# Altium PCB Power_Board-V1.0.PcbDoc (part 3 of 4)
Units mm, origin at the board's own origin, x right, y up, seen from the top; angles counter-clockwise.
Board outline 64.6 x 83.5 mm, 4 copper layers (Top Layer, GND1, GND2, Bottom Layer), stack 0.603 mm thick; 188 components, 131 nets, 487 pads, 123 vias.
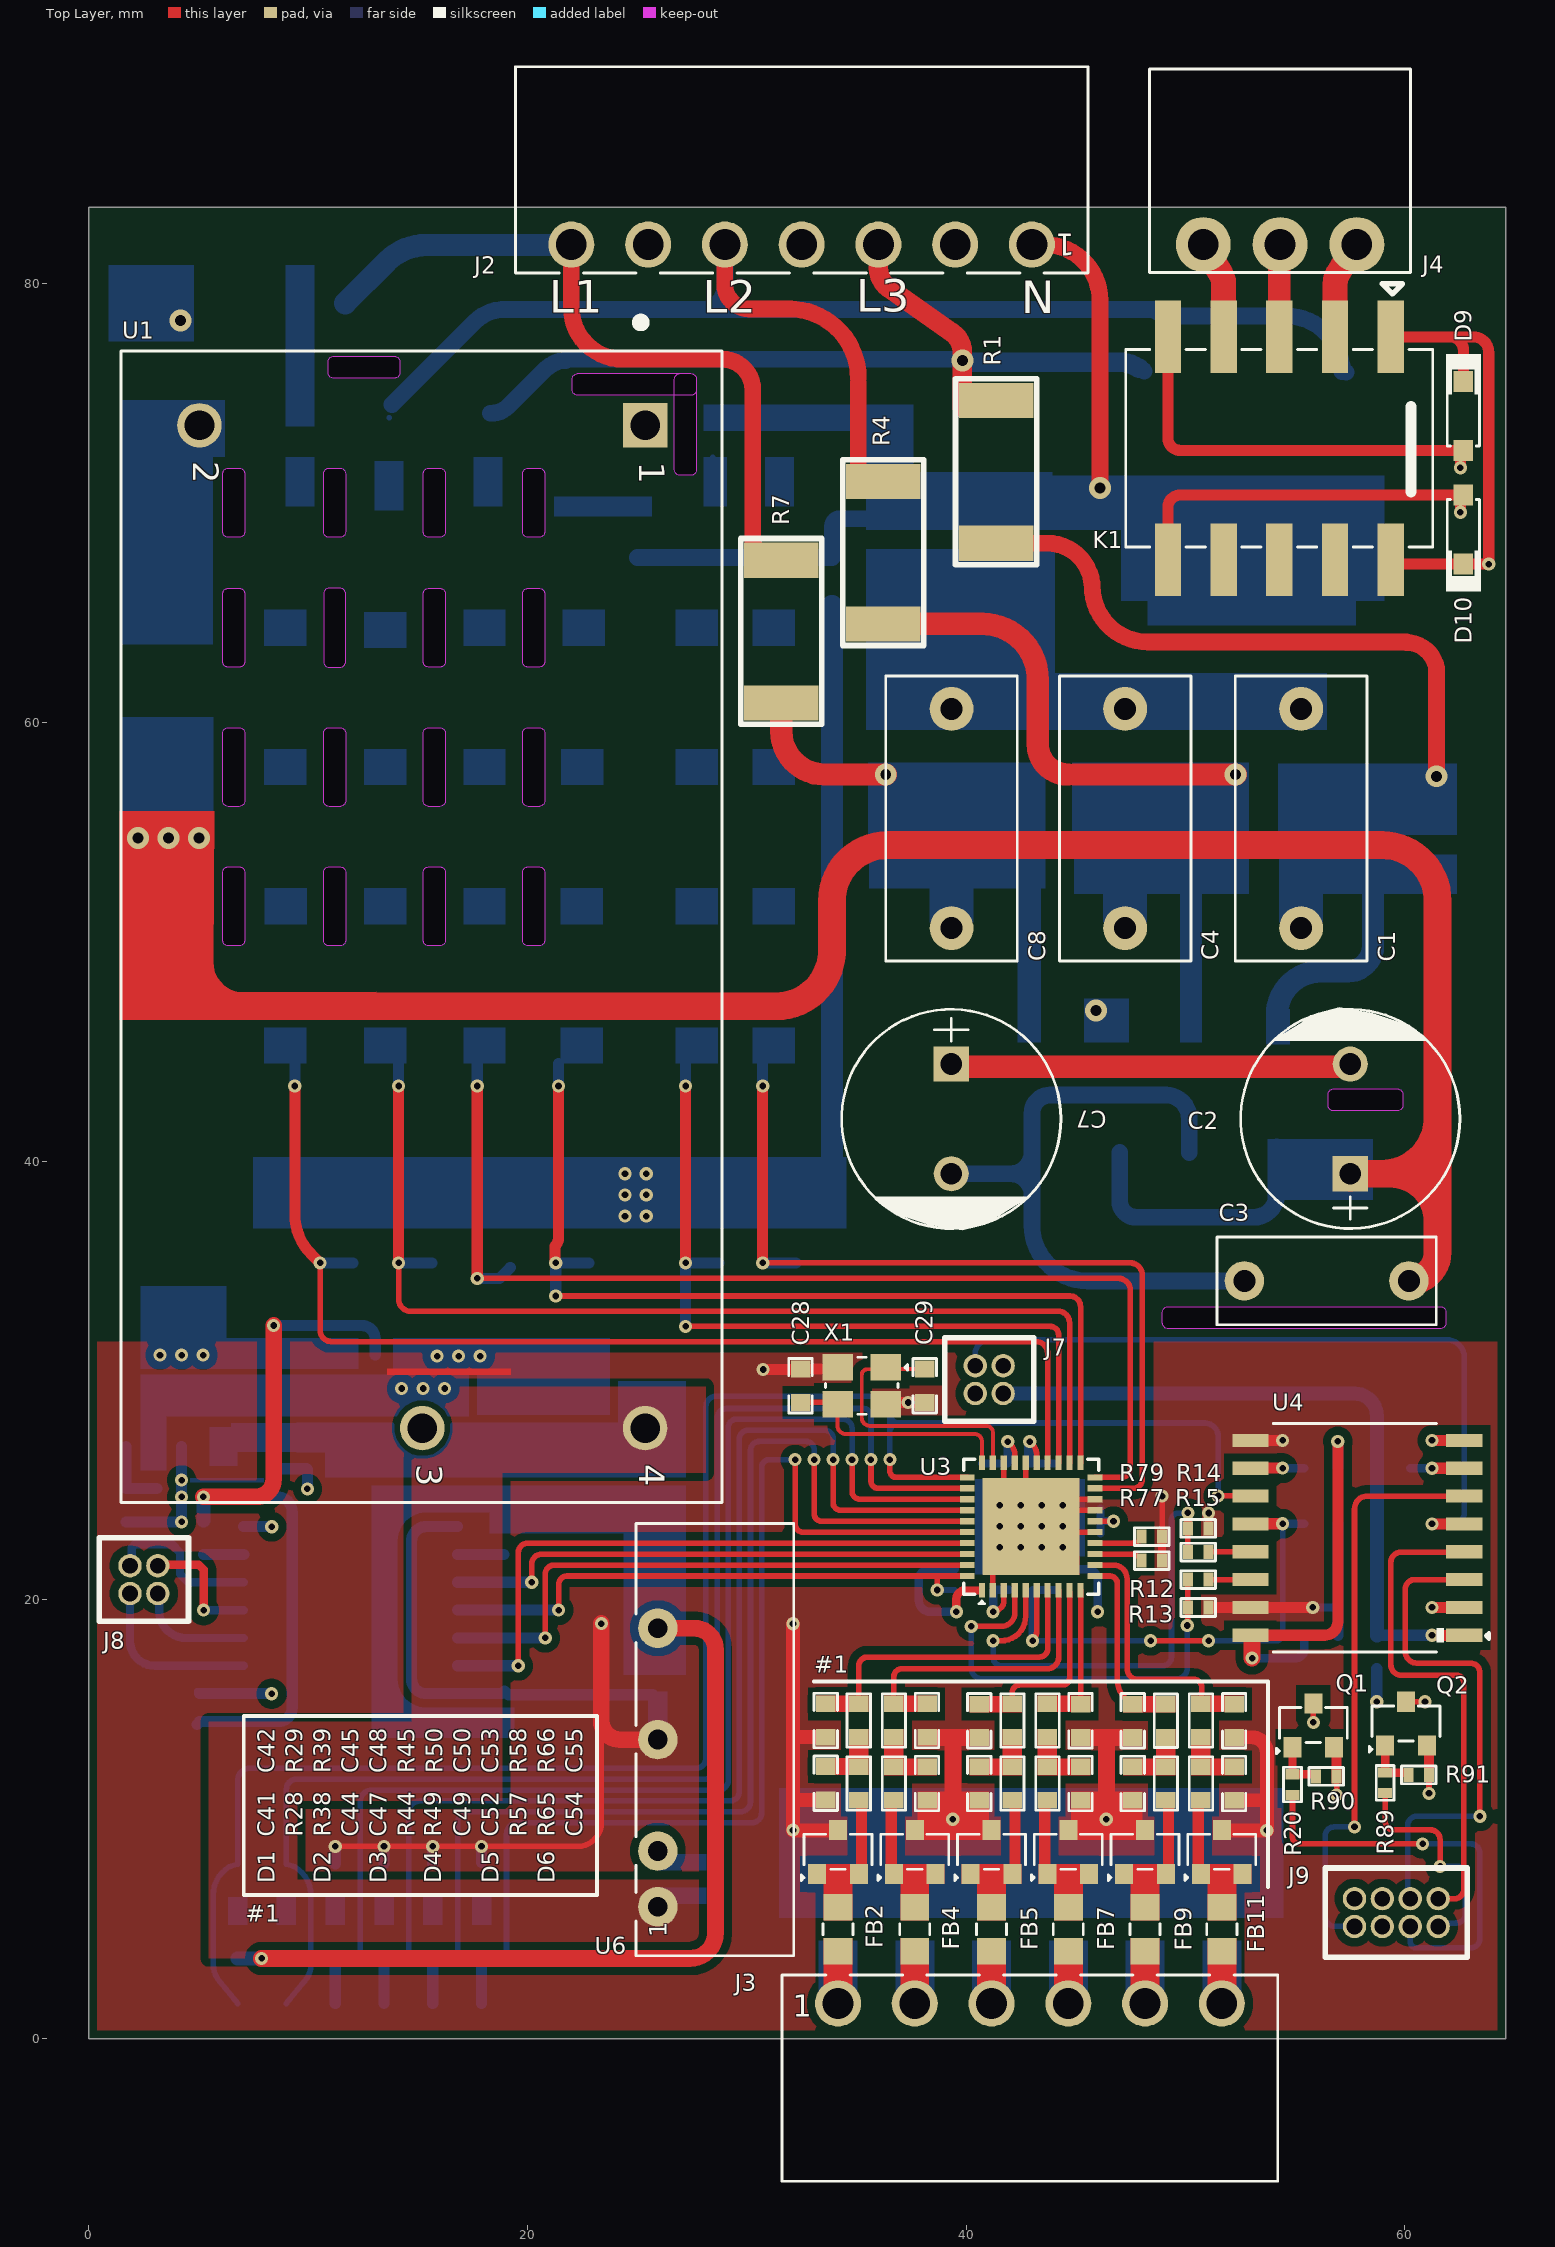
[diagram p0: Top Layer view]

## Via types
v1: diameter 0.6, hole 0.3, Top Layer to Bottom Layer, tented both sides, 113 vias
v2: diameter 1, hole 0.5, Top Layer to Bottom Layer, tented both sides, 10 vias

## Nets (pads, with @x,y where several pads share a name; then routed paths per layer and width w, separated by ;. In a path a pad name is that pad's centre, name@x,y a point inside that pad or via, vN(x,y) a via of type N, cw(c..) or ccw(c..) an arc to the next point about the centre after c; other vN are vias at no path point) (continued)
ADE_CF1: R83.2 TP3.1 U3.33 | length 58.1
  Top Layer w0.254: v1(34.795,26.399) 34.798,26.395 34.798,24.953 ccw(c35.161,24.953) 35.161,24.59 U3.33@40.058,24.59
  Bottom Layer w0.254: R83.2@11.233,3.655 11.995,3.655 ccw(c11.995,4.026) 12.366,4.026 12.366,10.793 cw(c12.905,10.793) 12.905,11.332 28.716,11.332 ccw(c28.716,11.767) 29.151,11.767 29.151,27.864 cw(c29.531,27.864) 29.531,28.244 34.376,28.244 cw(c34.376,27.823) 34.798,27.823 34.798,26.402 v1(34.795,26.399)
  Bottom Layer w0.508: TP3.1@11.233,1.597 R83.2@11.233,3.655
ADE_CF2: R84.2 TP4.1 U3.34 | length 55.3
  Top Layer w0.254: v1(33.931,26.399) 33.934,26.395 33.934,24.433 ccw(c34.277,24.433) 34.277,24.09 U3.34@40.058,24.09
  Bottom Layer w0.254: R84.2@13.458,3.655 14.22,3.655 ccw(c14.22,4.026) 14.591,4.026 14.591,10.338 cw(c15.088,10.338) 15.088,10.835 29.225,10.835 ccw(c29.225,11.269) 29.659,11.269 29.659,27.338 cw(c30.058,27.338) 30.058,27.736 33.558,27.736 cw(c33.558,27.36) 33.934,27.36 33.934,26.402 v1(33.931,26.399)
  Bottom Layer w0.508: TP4.1@13.458,1.597 R84.2@13.458,3.655
ADE_CF3: R85.2 TP5.1 U3.35 | length 52.6
  Top Layer w0.254: v1(33.068,26.399) 33.071,26.395 33.071,23.921 ccw(c33.402,23.921) 33.402,23.59 U3.35@40.058,23.59
  Bottom Layer w0.254: R85.2@15.683,3.655 16.445,3.655 ccw(c16.445,4.026) 16.816,4.026 16.816,9.84 cw(c17.314,9.84) 17.314,10.338 29.704,10.338 ccw(c29.704,10.801) 30.167,10.801 30.167,26.818 cw(c30.578,26.818) 30.578,27.228 32.689,27.228 cw(c32.689,26.846) 33.071,26.846 33.071,26.402 v1(33.068,26.399)
  Bottom Layer w0.508: TP5.1@15.683,1.597 R85.2@15.683,3.655
ADE_CF4: R86.2 TP6.1 U3.36 | length 49.4
  Top Layer w0.254: v1(32.204,26.399) 32.207,26.395 32.207,23.445 ccw(c32.563,23.445) 32.563,23.09 U3.36@40.058,23.09
  Bottom Layer w0.254: R86.2@17.908,3.655 18.67,3.655 ccw(c18.67,4.026) 19.041,4.026 19.041,9.323 cw(c19.559,9.323) 19.559,9.84 30.224,9.84 ccw(c30.224,10.291) 30.675,10.291 30.675,26.034 cw(c31.04,26.034) 31.04,26.399 v1(32.204,26.399)
  Bottom Layer w0.508: TP6.1@17.908,1.597 R86.2@17.908,3.655
ADE_IRQ0: LED5.2 TP1.1 U3.31 U4.11 | length 84.7
  Top Layer w0.254: v1(36.522,26.399) 36.522,25.876 ccw(c36.809,25.876) 36.809,25.59 U3.31@40.058,25.59 ; v1(51.489,24.74) U4.11@52.96,24.74
  Bottom Layer w0.254: 5.671,6.565 5.671,3.395 ccw(c6.91,3.395) 5.878,2.71 6.351,2.129 TP1.1@6.783,1.597 ; 5.671,6.568 cw(c7.095,6.566) 6.218,7.688 6.41,7.838 LED5.2@6.783,7.961 6.783,11.757 cw(c7.353,11.757) 7.353,12.327 27.688,12.327 ccw(c27.688,12.775) 28.135,12.775 28.135,28.821 cw(c28.6,28.821) 28.6,29.286 36.163,29.286 cw(c36.163,28.923) 36.525,28.923 36.525,26.402 v1(36.522,26.399) ; 36.549,27.802 cw(c36.927,27.665) 36.927,28.067 ; 36.549,28.332 ccw(c36.927,28.469) 36.927,28.067 ; v1(51.489,24.74) 51.489,27.454 ccw(c50.876,27.454) 50.876,28.067 36.927,28.067
ADE_IRQ1: LED6.2 TP2.1 U3.32 | length 61.8
  Top Layer w0.254: v1(35.658,26.399) 35.662,26.395 35.662,25.411 ccw(c35.983,25.411) 35.983,25.09 U3.32@40.058,25.09
  Bottom Layer w0.254: TP2.1@9.008,1.597 9.44,2.129 9.937,2.74 ccw(c9.026,3.345) 10.119,3.345 10.119,6.565 ; 10.119,6.567 ccw(c8.695,6.566) 9.572,7.688 9.381,7.838 LED6.2@9.008,7.961 9.008,11.37 cw(c9.468,11.37) 9.468,11.83 28.103,11.83 ccw(c28.103,12.37) 28.643,12.37 28.643,28.288 cw(c29.083,28.288) 29.083,28.727 35.319,28.727 cw(c35.319,28.385) 35.662,28.385 35.662,26.402 v1(35.658,26.399)
ADE_PM0: R12.1 U4.14 | length 1.9
  Top Layer w0.254: R12.1@51.052,20.924 51.052,20.927 U4.14@52.96,20.927

## Text inside footprints (layer, text, board x,y; h text height)
BR1: Bottom Overlay "+" at 53.458,41.686 h1 r270; Bottom Overlay "-" at 49.712,41.686 h1 r270; Bottom Overlay "~" at 55.089,44.816 h1 r90; Bottom Overlay "~" at 51.279,44.816 h1 r90
BR2: Bottom Overlay "~" at 44.111,44.816 h1 r90; Bottom Overlay "~" at 47.921,44.816 h1 r90; Bottom Overlay "-" at 42.543,41.686 h1 r270; Bottom Overlay "+" at 46.289,41.686 h1 r270
J2: Top Overlay "1" at 44.959,82.283 h1 r180
J3: Top Overlay "1" at 32.082,0.987 h1
J7: Dimensions "J1" at 44.3,29.346 h0.76 r90
J8: Dimensions "J1" at -0.889,21.641 h0.76 r270
J9: Dimensions "J1" at 60.313,8.997 h0.76 r180
U1: Top Overlay "1" at 24.704,71.905 h2 r270; Top Overlay "2" at 4.384,71.907 h2 r270; Top Overlay "3" at 14.566,26.185 h2 r270; Top Overlay "4" at 24.704,26.185 h2 r270
U6: Top Overlay "1" at 26.353,4.611 h0.8 r90